# Altium PCB New_Action.PcbDoc
Units mm, origin at the board's own origin, x right, y up, seen from the top; angles counter-clockwise.
Board outline 110 x 60 mm, 2 copper layers (Top Layer, Bottom Layer); 59 components, 58 nets, 238 pads, 14 vias.
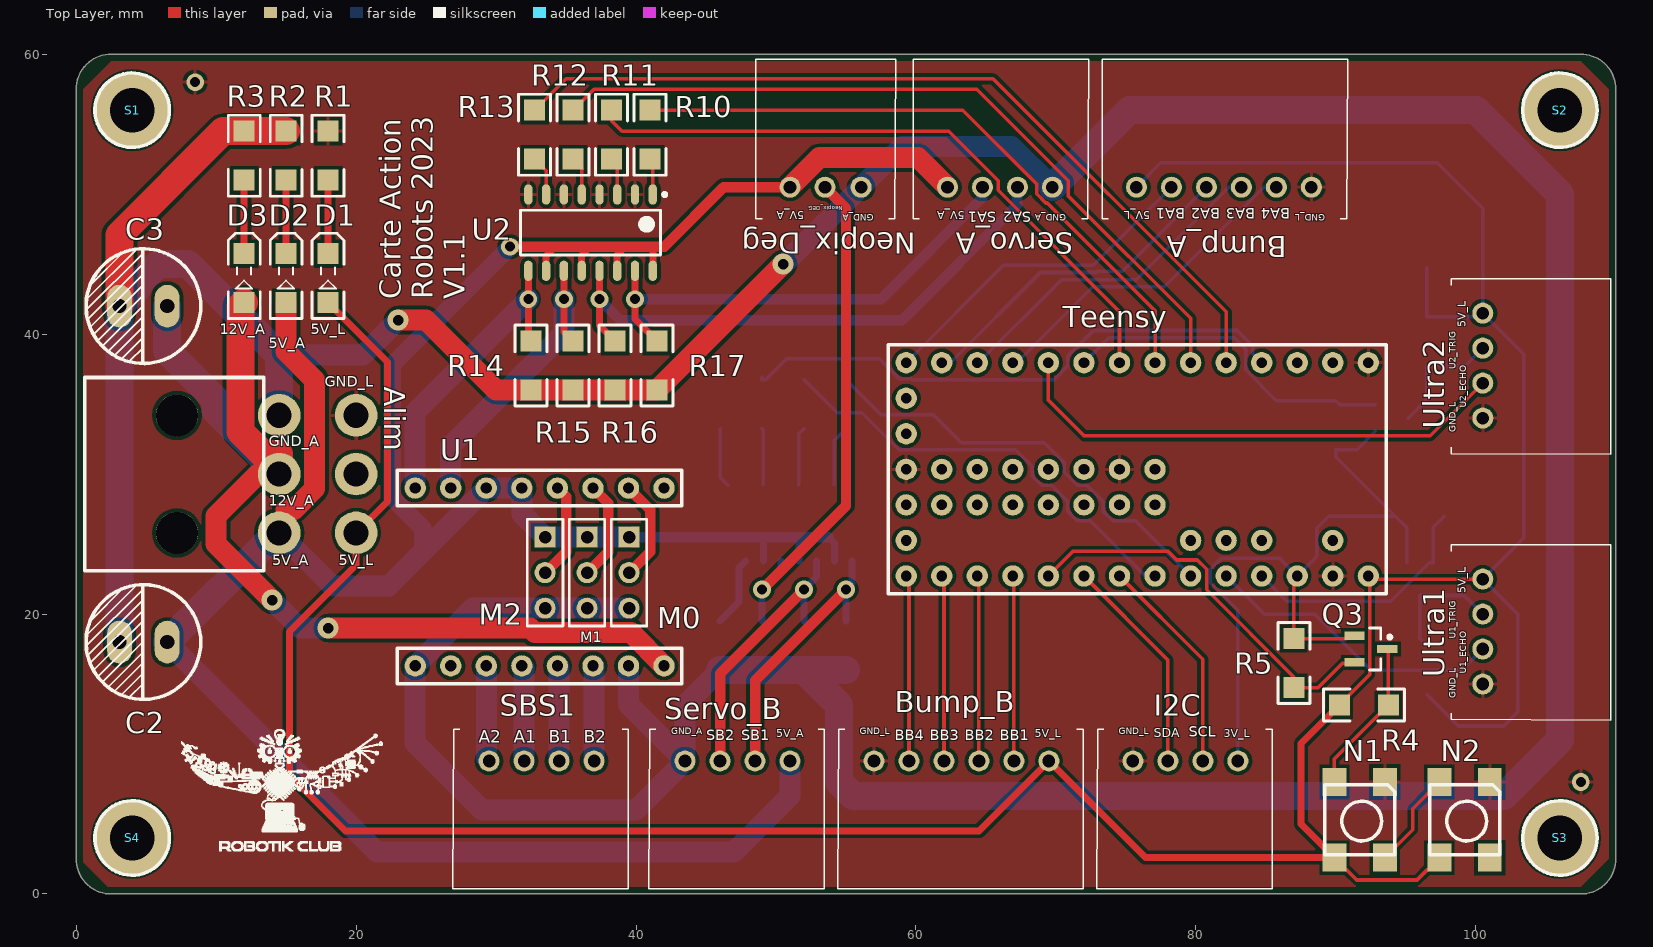
[diagram p0: Top Layer view]
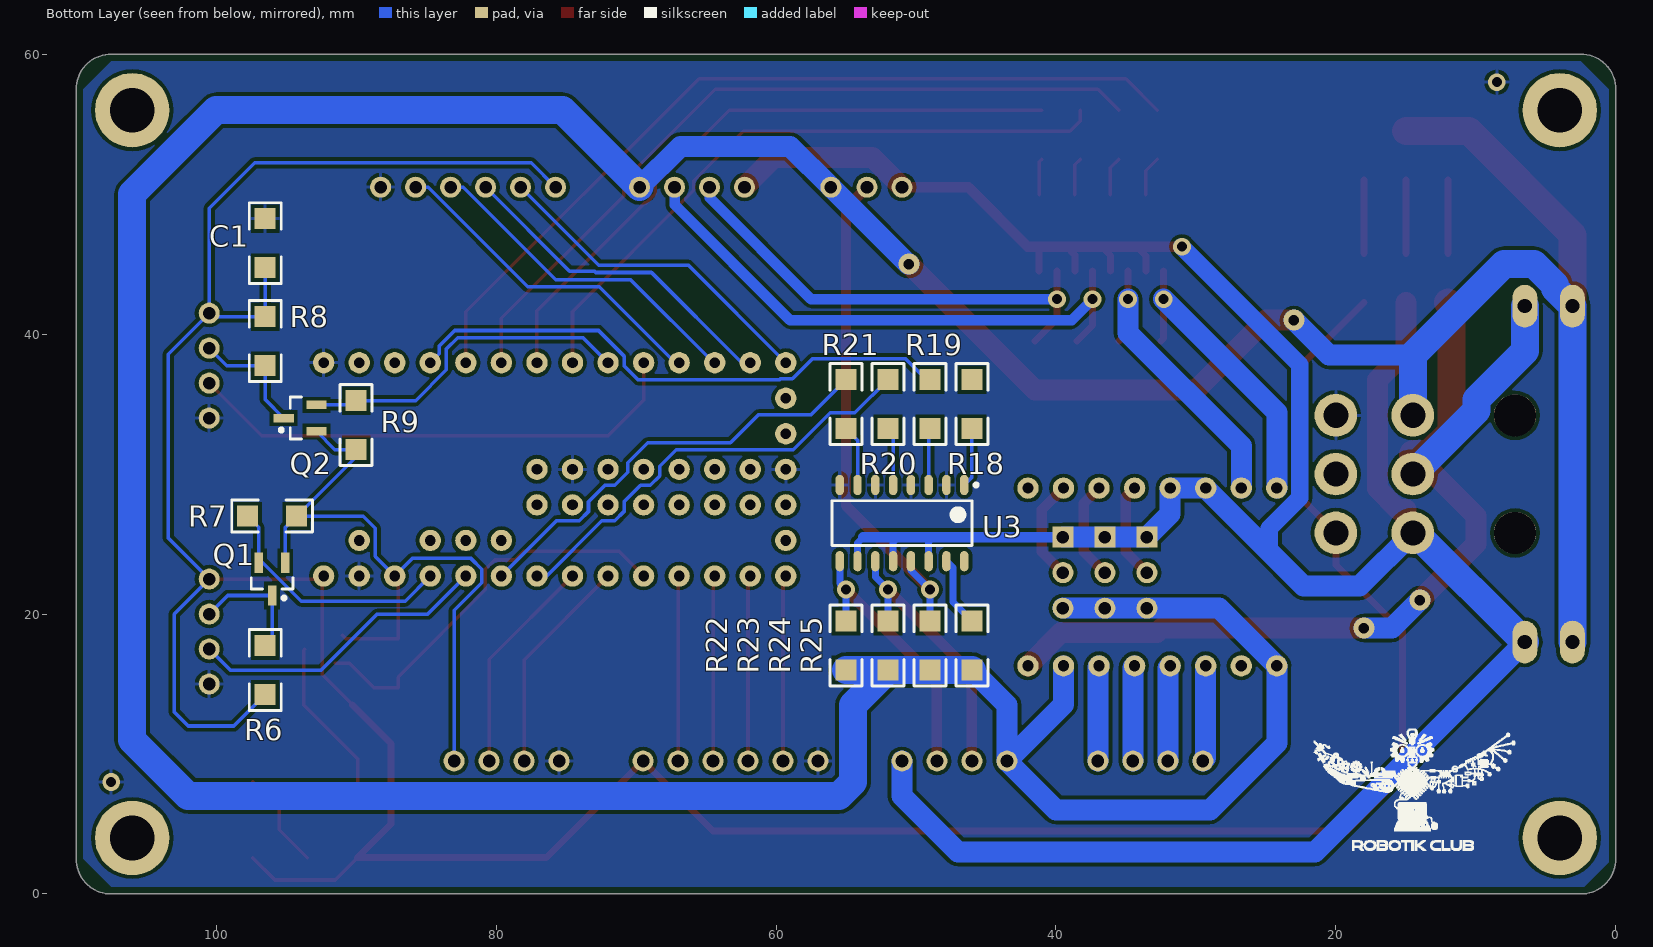
[diagram p1: Bottom Layer view, seen from below]

## Layer stack, top to bottom
Top Solder: solder mask 0.0102, Solder Resist, Dk 3.5
Top Layer: signal copper 0.0356
Dielectric 1: dielectric 0.32, FR-4, Dk 4.8
Bottom Layer: signal copper 0.0356
Bottom Solder: solder mask 0.0102, Solder Resist, Dk 3.5

## Board outline
2.5,60 107.5,60 cw(c107.5,57.5) 110,57.5 110,2.5 cw(c107.5,2.5) 107.5,0 2.5,0 cw(c2.5,2.5) 0,2.5 0,57.5 cw(c2.5,57.5)

## Design rules (kind name [scope] priority, off if disabled: settings)
Clearance [All] p1: gap=0.254
PolygonConnect [All] p1: connectstyle=Relief reliefconductorwidth=0.254 reliefentries=4 polygonreliefangle="90 Angle" airgapwidth=0.254
RoutingVias [All] p1: holewidth=0.711 width=1.27 viastyle="Through Hole" minholewidth=0.711 minwidth=1.27 maxholewidth=0.711 maxwidth=1.27
SolderMaskExpansion [All] p1: expansion=0.102
Width [All] p1: maxlimit=2 minlimit=0.254 preferedwidth=0.5
30 further rules are at their usual default settings.

## Classes and differential pairs
component class New_Action_Moteurs: M0 M1 M2 Neopix_Deg R10 R11 R12 R13 R14 R15 R16 R17 R18 R19 R20 R21 R22 R23 R24 R25 SBS1 Servo_A Servo_B U1 U2 U3
component class New_Action: Alim Bump_A Bump_B C1 C2 C3 D1 D2 D3 I2C N1 N2 Q1 Q2 Q3 R1 R2 R3 R4 R5 R6 R7 R8 R9 S1 S2 S3 S4 Teensy Ultra1 Ultra2

## Components (designator, comment, footprint, x,y, rotation, side; value= is the part's Value field where it differs from the comment)
Alim "Header 3X2H" MOLEX_MINIFITJR_3X2H 14.5,30 r270 top
Bump_A "Header 6H" S6B-XH-A 75.75,50.5 r0 top
Bump_B "Header 6H" S6B-XH-A 69.5,9.5 r180 top
C1 "(Optional)" "Capacitor 1206" 96.5,46.5 r270 bottom
C2 "Cap2" Condensateur 6.5,18 r180 top
C3 "Cap2" Condensateur 6.5,42 r180 top
D1 "5V_L" KP-3216SEC 18,44 r90 top
D2 "5V_A" KP-3216SEC 15,44 r90 top
D3 "12V_A" KP-3216SEC 12,44 r90 top
I2C "Header 4H" S4B-XH-A 83,9.5 r180 top
M0 "Header 3" HDR1X3 39.5,25.5 r270 top
M1 "Header 3" HDR1X3 36.5,25.5 r270 top
M2 "Header 3" HDR1X3 33.5,25.5 r270 top
N1 "WS2812C" WS2812C 93.5,8 r270 top
N2 "WS2812C" WS2812C 101,8 r270 top
Neopix_Deg "S3B-XH-A" S3B-XH-A 51,50.5 r0 top
Q1 "MOSFET-N" SOT23_M 96,22.5 r270 bottom
Q2 "MOSFET-N" SOT23_M 94,34 r0 bottom
Q3 "MOSFET-N" SOT23_M 92.5,17.5 r0 top
R1 "Res2" "Resistor 1206" 18,52.75 r270 top
R2 "Res2" "Resistor 1206" 15,52.75 r90 top
R3 "Res2" "Resistor 1206" 12,52.75 r90 top
R4 "Res2" "Resistor 1206" 92,13.5 r0 top
R5 "Res2" "Resistor 1206" 87,16.5 r270 top
R6 "Res2" "Resistor 1206" 96.5,16 r90 bottom
R7 "Res2" "Resistor 1206" 96,27 r0 bottom
R8 "Res2" "Resistor 1206" 96.5,39.5 r270 bottom
R9 "Res2" "Resistor 1206" 90,33.5 r90 bottom
R10 "Res2" "Resistor 1206" 41,54.25 r90 top
R11 "Res2" "Resistor 1206" 38.25,54.25 r90 top
R12 "Res2" "Resistor 1206" 35.5,54.25 r90 top
R13 "Res2" "Resistor 1206" 32.75,54.25 r90 top
R14 "Res2" "Resistor 1206" 32.5,37.75 r90 top
R15 "Res2" "Resistor 1206" 35.5,37.75 r90 top
R16 "Res2" "Resistor 1206" 38.5,37.75 r90 top
R17 "Res2" "Resistor 1206" 41.5,37.75 r90 top
R18 "Res2" "Resistor 1206" 46,35 r90 bottom
R19 "Res2" "Resistor 1206" 49,35 r90 bottom
R20 "Res2" "Resistor 1206" 52,35 r90 bottom
R21 "Res2" "Resistor 1206" 55,35 r90 bottom
R22 "Res2" "Resistor 1206" 55,17.75 r90 bottom
R23 "Res2" "Resistor 1206" 52,17.75 r90 bottom
R24 "Res2" "Resistor 1206" 49,17.75 r90 bottom
R25 "Res2" "Resistor 1206" 46,17.75 r90 bottom
S1 "Screw M3" "Screw M3" 4,56 r0 top
S2 "Screw M3" "Screw M3" 106,56 r0 top
S3 "Screw M3" "Screw M3" 106,4 r0 top
S4 "Screw M3" "Screw M3" 4,4 r0 top
SBS1 "Header 4" S4B-XH-A 37,9.5 r180 top
Servo_A "Header 4H" S4B-XH-A 62.25,50.5 r0 top
Servo_B "Header 4H" S4B-XH-A 51,9.5 r180 top
Teensy "Teensy 3.2" teensy 72,40.5 r270 top
U1 "DRV8825" DRV8825 42,29 r270 top
U2 "PhotoCoupler" "16 pins SOIC, TI" 36.75,47.25 r270 top
U3 "PhotoCoupler" "16 pins SOIC, TI" 51,26.5 r270 bottom
Ultra1 "Header 4H" S4B-XH-A 100.5,22.5 r270 top
Ultra2 "Header 4H" S4B-XH-A 100.5,41.5 r270 top
? "" Logo_lowres 14.5,8 r0 top
? "" Logo_lowres 14.576,8.025 r180 top

## Footprints (in the part's own frame and the unit in brackets; to place one, negate y for a bottom-side part, rotate by r counter-clockwise, add the part's x,y. Pads: shape width x height; smd on the part's side, far side on the other; paste and mask are expansions set on the pad)
"16 pins SOIC, TI" [mm] "SOIC, 16-Leads, Body 9,90x3,90mm, Pitch 1,27mm, IPC Medium Density"
  oval 1.45x0.6 smd: 1(-2.725,4.445) 2(-2.725,3.175) 3(-2.725,1.905) 4(-2.725,0.635) 5(-2.725,-0.635) 6(-2.725,-1.905) 7(-2.725,-3.175) 8(-2.725,-4.445) 9(2.725,-4.445) 10(2.725,-3.175) 11(2.725,-1.905) 12(2.725,-0.635) 13(2.725,0.635) 14(2.725,1.905) 15(2.725,3.175) 16(2.725,4.445)
  silkscreen extent -2.85,-5 1.6,5.42, body extent -3,-5 3,5, height 1.75
"Capacitor 1206" [mm]
  rect 1.5x1.5 smd: 1(-1.75,0) 2(1.75,0)
  silkscreen extent -2.89,-1.14 2.89,1.14, body extent -1.98,-0.99 1.98,0.96, height 1.3
Condensateur [mil]
  oval 70x120 hole 40: 1(0,0) 2(133.86,0)
  silkscreen extent -94,-161 228,161, body extent -93,-160 227,160, height 500
DRV8825 [mil] "Stepper Driver"
  round 60 hole 31.5: 1(0,0) 2(0,-100) 3(0,-200) 4(0,-300) 5(0,-400) 6(0,-500) 7(0,-600) 8(0,-700) 9(500,-700) 10(500,-600) 11(500,-500) 12(500,-400) 13(500,-300) 14(500,-200) 15(500,-100) 16(500,0)
  silkscreen extent -50,-750 550,50, body extent -50,-764 550,63, height 446
HDR1X3 [mm] "Connector; Header; 3 Position"
  rect 1.5x1.5 hole 0.9: 1(0,0)
  round 1.5 hole 0.9: 2(2.54,0) 3(5.08,0)
  silkscreen extent -1.27,-1.27 6.35,1.27
KP-3216SEC [mm]
  rect 1.5x1.5 smd: 1(-1.75,0) 2(1.75,0)
  silkscreen extent -2.89,-1.14 3.2,1.14, body extent -1.7,-0.79 1.5,0.81, height 1.1
Logo_lowres [mm]
  silkscreen extent -7.01,-4.93 7.39,3.76
MOLEX_MINIFITJR_3X2H [mm] "MOLEX_MINIFITJR_3X2H, 39-30-1060"
  round 3.048 hole 1.8: 1(-4.2,5.5) 2(-4.2,0) 3(0,5.5) 4(0,0) 5(4.2,5.5) 6(4.2,0)
  round 3 hole 3 unplated: 10(-4.2,-7.3) 11(4.2,-7.3)
  silkscreen extent -6.9,-13.9 6.9,-1.1, body extent -6.9,-13.9 7.3,6.04, height 11.41
"Resistor 1206" [mm]
  rect 1.5x1.5 smd: 1(-1.75,0) 2(1.75,0)
  silkscreen extent -2.89,-1.14 2.89,1.14, body extent -1.98,-0.95 1.98,0.93, height 0.55
S3B-XH-A [mm]
  round 1.5 hole 0.9: 1(0,0) 2(2.5,0) 3(5.08,0)
  silkscreen extent -2.45,-2.26 7.54,9.14, body extent -2.44,-2.27 7.46,9.23, height 6.15
S4B-XH-A [mm]
  round 1.5 hole 0.9: 1(0,0) 2(2.5,0) 3(5,0) 4(7.5,0)
  silkscreen extent -2.45,-2.26 10.08,9.14, body extent -2.44,-2.32 9.96,9.18, height 6.15
S6B-XH-A [mm]
  round 1.5 hole 0.9: 1(0,0) 2(2.5,0) 3(5,0) 4(7.5,0) 5(10,0) 6(12.5,0)
  silkscreen extent -2.45,-2.26 15.08,9.14, body extent -2.45,-2.3 14.95,9.2, height 6.15
"Screw M3" [mm] "M3 iso Screw"
  round 5.32 hole 3.2 unplated: 0(0,0)
  silkscreen extent -2.66,-2.66 2.66,2.66
SOT23_M [mm] "SOT23, 3-Leads, Body 2.9x1.3mm, Pitch 0.95mm, Lead Span 2.3mm - Reverse Pinning, IPC Low Density"
  rect 1.45x0.6 smd: 1(1.175,0) 2(-1.175,-0.95) 3(-1.175,0.95)
  silkscreen extent -0.1,-1.5 1.47,1.5, body extent -0.7,-1.5 0.7,1.5, height 1.1
teensy [mil] "Teensy 3.2"
  round 60 hole 30: 0(100,700) 1(100,600) 2(100,500) 3(100,400) 4(100,300) 5(100,200) 6(100,100) 7(100,0) 8(100,-100) 9(100,-200) 10(100,-300) 11(100,-400) 12(100,-500) 13(700,-500) 14(700,-400) 15(700,-300) 16(700,-200) 17(700,-100) 18(700,0) 19(700,100) 20(700,200) 21(700,300) 22(700,400) 23(700,500) 24(400,0) 25(400,-100) 26(400,-200) 27(400,-300) 28(400,-400) 29(500,-400) 30(500,-300) 31(500,-200) 32(500,-100) 33(500,0) 34(600,400) 35(600,300) 36(400,200) 37(500,200) 38(600,500) 39(500,100) 40(400,100) 41(700,600) 42(700,700) 43(700,800) 44(100,800) 45(600,-500) 46(500,-500) 47(400,-500) 48(300,-500) 49(200,-500) 50(600,700)
  silkscreen extent 50,-550 750,850, body extent 49,-561 753,904, height 468
WS2812C [mm]
  rect 2x1.7 smd: 1(5.4,-3.6) 2(5.4,0) 3(0,0) 4(0,-3.6)
  silkscreen extent 0.2,-4.3 5.2,0.7, body extent 0.19,-4.33 5.19,0.67, height 2

## Part data
Alim: "Header, 3-Pin, Dual row, Right Angle"
Bump_A Bump_B: "Header, 6-Pin, Right Angle"
C1: library part Cap, "Capacitor"
C2 C3: "Capacitor"
D1 D2 D3: library part LED2, "Typical RED, GREEN, YELLOW, AMBER GaAs LED"
I2C Servo_A Servo_B Ultra1 Ultra2: "Header, 4-Pin, Right Angle"
M0 M1 M2: "Header, 3-Pin"
N1 N2: "Intelligent control LED"
Neopix_Deg: library part "Header 3H", "Header, 3-Pin, Right Angle"
Q1 Q2 Q3: "N-Channel MOSFET"
R1 R2 R3 R4 R5 R6 R7 R8 R9 R10 R11 R12 R13 R14 R15 R16 R17 R18 R19 R20 R21 R22 R23 R24 R25: "Resistor"
SBS1: "Header, 4-Pin"
Teensy: library part teensy3.2
U1: "Stepper Driver Module"
U2 U3: library part LTV-247, "Integrated Circuit"

## Via types
v1: diameter 1.27, hole 0.711, Top Layer to Bottom Layer, 10 vias
v2: diameter 1.5, hole 0.75, Top Layer to Bottom Layer, 4 vias

## Nets (pads, with @x,y where several pads share a name; then routed paths per layer and width w, separated by ;. In a path a pad name is that pad's centre, name@x,y a point inside that pad or via, vN(x,y) a via of type N, cw(c..) or ccw(c..) an arc to the next point about the centre after c; other vN are vias at no path point)
3V_L: I2C.1 Q1.3 Q2.3 Q3.3 R5.1 R7.1 R9.1 Teensy.41 | length 53.8
  Top Layer w0.254: Teensy.41 87,22.48 R5.1 90.75,18.25 Q3.3@91,18.5
  Bottom Layer w0.254: I2C.1 83,20.264 81.017,22.247 81.017,23.193 81.824,24 85.96,24 Teensy.41 88.637,24.117 88.637,26.137 89.5,27 R7.1 ; Q2.3 91.525,31.75 R9.1 90,31.25 R7.1 ; Q1.3 95.05,26.2 R7.1
5V_A: Alim.6 C2.1 D2.1 M0.1 M1.1 M2.1 Neopix_Deg.1 Servo_A.1 Servo_B.1 U1.5 U1.6 U2.10 U2.12 U2.14 U2.16 U3.10 U3.12 U3.14 | length 205.4
  Top Layer w0.5: U2.10 33.575,45.575 34.25,46.25 ; U2.12 36.115,45.615 36.75,46.25 ; U2.14 38.655,45.655 39.25,46.25 ; U2.16 41.195,45.945 41.5,46.25
  Top Layer w0.75: v1(31,46.25) 34.25,46.25 36.75,46.25 39.25,46.25 41.5,46.25 42,46.25 46.25,50.5 Neopix_Deg.1
  Top Layer w1.5: Alim.6 15,26.3 15,27.472 15.547,27.472 17.028,28.953 17.028,36.728 15,38.756 D2.1 ; Neopix_Deg.1 53.103,52.603 60.147,52.603 Servo_A.1
  Bottom Layer w0.5: 48.75,25.5 49.095,25.155 U3.14 ; 51.25,25.5 51.635,25.115 U3.12 ; 53.75,25.5 54.175,25.075 U3.10
  Bottom Layer w0.75: M0.1 48.75,25.5 51.25,25.5 53.75,25.5
  Bottom Layer w1.25: 25.237,24.937 24.763,24.937 24.763,26.137 22.579,28.32 22.579,37.829 v1(31,46.25)
  Bottom Layer w1.5: C2.1 21.5,3 47,3 51,7 Servo_B.1 ; Alim.6 18.3,22 22.3,22 25.237,24.937 U1.6 U1.5 31.84,27.16 M2.1 M1.1 M0.1
  Bottom Layer w2: C2.1 14.3,25.8 Alim.6
5V_L: Alim.5 Bump_A.1 Bump_B.1 C1.2 D1.1 N1.1 N2.1 R4.1 R6.1 R8.1 Teensy.43 Ultra1.1 Ultra2.1 | length 241.2
  Top Layer w0.254: N1.1 91.5,1 95.8,1 N2.1 ; R4.1 92.431,15.681 Teensy.43@92.431,22.609 ; Teensy.43 Teensy.43@92.431,22.609 ; Ultra1.1 92.54,22.5 Teensy.43@92.431,22.609
  Top Layer w0.5: D1.1 22.25,38 22.25,28.05 Alim.5 20,23.5 15.25,18.75 15.25,8.5 19.25,4.5 64.5,4.5 Bump_B.1 76.4,2.6 N1.1 87.5,5 87.5,10.75 R4.1
  Bottom Layer w0.254: Bump_A.1 77.5,52.25 97.25,52.25 100.5,49 Ultra2.1 103.429,38.571 103.429,25.429 Ultra1.1 103,20 103,13 102,12 98.75,12 R6.1 ; C1.2 R8.1 Ultra2.1@100.25,41.25
12V_A: Alim.4 C3.1 D3.1 U1.16 | length 72.8
  Top Layer w1.5: v2(14,21) 10,25 10,27 13,30 Alim.4 ; v2(18,19) 32.439,19 32.773,18.666 39.634,18.666 U1.16
  Top Layer w2: D3.1 11.722,41.972 11.722,33.049 13.349,31.422 14.5,31.422 Alim.4
  Bottom Layer w1.5: v2(14,21) 16,19 v2(18,19)
  Bottom Layer w2: C3.1 6.5,38.795 9.954,35.341 9.954,34.546 Alim.4
GND_A: Alim.2 C2.2 C3.2 M0.3 M1.3 M2.3 Neopix_Deg.3 R2.2 R3.2 R14.1 R15.1 R16.1 R17.1 R22.1 R23.1 R24.1 R25.1 Servo_A.4 Servo_B.4 U1.9 U1.15 | length 343.5
  Top Layer w1.5: v2(23,41) 25,41 30,36 R17.1 v2(50.5,45)
  Top Layer w2: C3.2 3.1,47.1 10.5,54.5 R2.2
  Bottom Layer w1.5: 14.5,38.5 20.5,38.5 v2(23,41) ; U1.15 39.46,13.54 Servo_B.4 ; M0.3 M1.3 M2.3 28.34,20.42 U1.9 24.22,10.78 29,6 40,6 Servo_B.4 ; R25.1 43.5,13.5 Servo_B.4 ; v2(50.5,45) 50.58,45 Neopix_Deg.3 59,53.42 66.83,53.42 Servo_A.4
  Bottom Layer w2: C2.2 C3.2 4.357,43.257 4.357,43.523 5.834,45 8,45 14.5,38.5 Alim.2 ; R25.1 R24.1 R23.1 ; R22.1 R23.1 ; Servo_A.4 75.25,56 100,56 106,50 106,11 102,7 55.5,7 54.5,8 54.5,13.5 R23.1
GND_L: Alim.1 Bump_A.6 Bump_B.6 C1.1 I2C.4 N1.3 N2.3 R1.1 Teensy.40 Teensy.42 Teensy.44 Teensy.47 U2.2 U2.4 U2.6 U2.8 U3.2 U3.4 U3.6 U3.8 Ultra1.4 Ultra2.4
  other v1: 107.5,8 8.5,58
I2C_SCL: I2C.2 Teensy.19 | length 15.7
  Top Layer w0.254: Teensy.19 80.5,16.76 I2C.2
I2C_SDA: I2C.3 Teensy.18 | length 15.7
  Top Layer w0.254: Teensy.18 78,16.72 I2C.3
NEOPIXEL: N1.4 Q3.1 R4.2 | length 11.1
  Top Layer w0.254: N1.4 89.9,9.65 R4.2 93.75,17.425 Q3.1
NetD1_2: D1.2 R1.2 | length 5.3
  Top Layer w0.5: D1.2 R1.2
NetD2_2: D2.2 R2.1 | length 5.3
  Top Layer w0.5: D2.2 R2.1
NetD3_2: D3.2 R3.1 | length 5.3
  Top Layer w0.5: D3.2 R3.1
NetN1_2: N1.2 N2.4 | length 7
  Top Layer w0.254: N1.2 95.5,4.6 95.5,6.1 N2.4
NetR10_1: R10.1 U2.1 | length 2.6
  Top Layer w0.254: R10.1 41.195,52.305 U2.1
NetR11_1: R11.1 U2.3 | length 2.7
  Top Layer w0.254: R11.1 38.655,52.095 U2.3
NetR12_1: R12.1 U2.5 | length 2.8
  Top Layer w0.254: R12.1 36.115,51.885 U2.5
NetR13_1: R13.1 U2.7 | length 2.9
  Top Layer w0.254: R13.1 33.575,51.675 U2.7
NetR18_1: R18.1 U3.1 | length 4.3
  Bottom Layer w0.254: R18.1 46,29.78 U3.1
NetR19_1: R19.1 U3.3 | length 4.1
  Bottom Layer w0.254: R19.1 49.095,33.155 U3.3
NetR20_1: R20.1 U3.5 | length 4.2
  Bottom Layer w0.254: U3.5 51.635,32.885 R20.1
NetR21_1: R21.1 U3.7 | length 4.4
  Bottom Layer w0.254: U3.7 54.175,32.425 R21.1
NetR25_2: R25.2 U3.15 | length 5
  Bottom Layer w0.5: R25.2 47.359,20.859 47.359,23.309 U3.15
NetSBS1_1: SBS1.1 U1.14 | length 6.8
  Bottom Layer w1.5: U1.14 37,16.22 SBS1.1
NetSBS1_2: SBS1.2 U1.13 | length 6.8
  Bottom Layer w1.5: U1.13 34.5,16.18 SBS1.2
NetSBS1_3: SBS1.3 U1.12 | length 6.9
  Bottom Layer w1.5: U1.12 32,16.14 SBS1.3
NetSBS1_4: SBS1.4 U1.11 | length 6.9
  Bottom Layer w1.5: U1.11 29.3,9.7 SBS1.4
O_NEOPIX_DEG: Neopix_Deg.2 R24.2 U3.13 | length 36.7
  Top Layer w0.75: v1(49,21.75) 55,27.75 55,49 Neopix_Deg.2
  Bottom Layer w0.5: R24.2 v1(49,21.75) 50.365,23.115 U3.13
O_SBS_DIR: R15.2 U1.7 U2.11 | length 22.1
  Top Layer w0.5: U2.11 v1(34.845,42.5) 34.845,40.155 R15.2
  Bottom Layer w1.5: U1.7 26.76,32.01 34.845,40.095 v1(34.845,42.5)
O_SBS_STEP: R14.2 U1.8 U2.9 | length 22
  Top Layer w0.5: U2.9 32.305,39.695 R14.2
  Bottom Layer w1.5: U1.8 24.22,34.415 v1(32.305,42.5)
O_SERVO_A1: R17.2 Servo_A.2 U2.15 | length 34.3
  Top Layer w0.5: U2.15 39.925,41.075 R17.2
  Bottom Layer w0.75: v1(39.925,42.5) 57.5,42.5 64.75,49.75 Servo_A.2
O_SERVO_A2: R16.2 Servo_A.3 U2.13 | length 40.6
  Top Layer w0.5: U2.13 37.385,40.615 R16.2
  Bottom Layer w0.75: v1(37.385,42.5) 38.885,41 59,41 67.25,49.25 Servo_A.3
O_SERVO_B1: R22.2 Servo_B.2 U3.9 | length 19.4
  Top Layer w0.75: Servo_B.2 48.5,15.25 v1(55,21.75)
  Bottom Layer w0.5: R22.2 v1(55,21.75) 55.445,22.195 U3.9
O_SERVO_B2: R23.2 Servo_B.3 U3.11 | length 19.4
  Top Layer w0.75: Servo_B.3 46,15.75 v1(52,21.75)
  Bottom Layer w0.5: R23.2 v1(52,21.75) 52.905,22.655 U3.11
SBS_M0: M0.2 U1.2 | length 7.3
  Top Layer w0.75: U1.2 41,27.46 41,24.46 M0.2
SBS_M1: M1.2 U1.3 | length 7.1
  Top Layer w0.75: M1.2 38,24.46 38,27.92 U1.3
SBS_M2: M2.2 U1.4 | length 6.9
  Top Layer w0.75: M2.2 35,24.46 35,28.38 U1.4
T_BUMP_A1: Bump_A.2 Teensy.12 | length 24.1
  Bottom Layer w0.254: Teensy.12 66.25,44.91 72.66,44.91 Bump_A.2
T_BUMP_A2: Bump_A.3 Teensy.11 | length 24.1
  Bottom Layer w0.254: Teensy.11 62.46,37.96 68.902,44.402 72.87,44.402 72.968,44.5 74.75,44.5 Bump_A.3
T_BUMP_A3: Bump_A.4 Teensy.10 | length 24.1
  Bottom Layer w0.254: Teensy.10 64.46,37.96 70.394,43.894 75.743,43.894 82.349,50.5 Bump_A.4
T_BUMP_A4: Bump_A.5 Teensy.9 | length 24
  Bottom Layer w0.254: Teensy.9 67.21,37.96 72.636,43.386 77.735,43.386 84.849,50.5 Bump_A.5
T_BUMP_B1: Bump_B.2 Teensy.16 | length 13.3
  Top Layer w0.254: Teensy.16 67,22.64 Bump_B.2
T_BUMP_B2: Bump_B.3 Teensy.15 | length 13.3
  Top Layer w0.254: Teensy.15 64.5,22.6 Bump_B.3
T_BUMP_B3: Bump_B.4 Teensy.14 | length 13.3
  Top Layer w0.254: Teensy.14 62,22.56 Bump_B.4
T_BUMP_B4: Bump_B.5 Teensy.13 | length 13.3
  Top Layer w0.254: Teensy.13 59.5,22.52 Bump_B.5
T_NEOPIX_DEG: R19.2 Teensy.2 | length 40.3
  Bottom Layer w0.254: R19.2@49,36.925 R19.2 49.25,36.75 50.75,38.25 57.394,38.25 58.827,36.817 59.683,36.817 59.75,36.75 69.866,36.75 70.857,37.741 70.857,38.433 72.682,40.258 82.96,40.258 84.065,39.153 84.065,38.595 Teensy.2
T_NEOPIXEL: Q3.2 R5.2 Teensy.17 | length 28.8
  Top Layer w0.254: Teensy.17 71.24,24.5 78,24.5 78.637,23.863 80.093,23.863 80.763,23.193 80.763,21.737 87,15.5 R5.2 88.75,14.75 90.5,16.5 Q3.2@91.5,16.5
T_SBS_DIR: R12.2 Teensy.4 | length 55.3
  Top Layer w0.254: R12.2 37,57.5 64.349,57.5 70.881,50.968 70.881,49.869 79.62,41.13 Teensy.4
T_SBS_STEP: R13.2 Teensy.3 | length 60.9
  Top Layer w0.254: R13.2 35,58.25 65.5,58.25 82.16,41.59 Teensy.3
T_SERVO_A1: R10.2 Teensy.5 | length 46.1
  Top Layer w0.254: R10.2 63.349,56 68.619,50.73 68.619,50.032 69.282,49.369 69.381,49.369 77.08,41.67 Teensy.5
T_SERVO_A2: R11.2 Teensy.6 | length 46.7
  Top Layer w0.254: R11.2 38.25,55.25 39,54.5 62.349,54.5 65.881,50.968 65.881,50.27 74.54,41.611 Teensy.6
T_SERVO_B1: R21.2 Teensy.21 | length 31.2
  Bottom Layer w0.254: R21.2 57.5,34.25 61.25,34.25 63.255,32.245 69.171,32.245 70.603,30.813 70.603,30.121 71.527,29.197 72.219,29.197 73.397,28.019 73.397,27.327 74.067,26.657 75.683,26.657 Teensy.21
T_SERVO_B2: R20.2 Teensy.20 | length 31.7
  Bottom Layer w0.254: R20.2 54.369,34.381 56.131,34.381 58.775,31.737 67.139,31.737 68.317,30.559 68.317,29.867 68.987,29.197 69.679,29.197 70.857,28.019 70.857,27.327 71.527,26.657 72.443,26.657 76.38,22.72 Teensy.20
T_ULTRA1_ECHO: Teensy.22 Ultra1.3 | length 21.7
  Bottom Layer w0.254: Teensy.22 84.88,20 88.5,20 92.5,16 99,16 Ultra1.3
T_ULTRA1_TRIG: Q1.2 R7.2 Teensy.23 | length 17.8
  Bottom Layer w0.254: Teensy.23 86.5,20.92 93.92,20.92 96.675,23.675 Q1.2 96.95,26.2 R7.2
T_ULTRA2_ECHO: Teensy.8 Ultra2.3 | length 36.3
  Top Layer w0.254: Teensy.8 69.46,35.29 72,32.75 96.75,32.75 Ultra2.3
T_ULTRA2_TRIG: Q2.2 R9.2 Teensy.7 | length 24.4
  Bottom Layer w0.254: Teensy.7 73.79,39.75 82.75,39.75 83.557,38.943 83.557,37.443 85.75,35.25 R9.2 90.3,34.95 Q2.2
ULTRA1_TRIG: Q1.1 R6.2 Ultra1.2 | length 8.8
  Bottom Layer w0.254: R6.2 96,18.25 Q1.1 99.175,21.325 Ultra1.2
ULTRA2_TRIG: Q2.1 R8.2 Ultra2.2 | length 8.8
  Bottom Layer w0.254: Q2.1 96.5,35.325 R8.2 99.25,37.75 Ultra2.2
pads on no net: Alim.3 Alim.10 Alim.11 N2.2 R18.2 S1.0 S2.0 S3.0 S4.0 Teensy.0 Teensy.1 Teensy.24 Teensy.25 Teensy.26 Teensy.27 Teensy.28 Teensy.29 Teensy.30 Teensy.31 Teensy.32 Teensy.33 Teensy.34 Teensy.35 Teensy.36 Teensy.37 Teensy.38 Teensy.39 Teensy.45 Teensy.46 Teensy.48 Teensy.49 Teensy.50 U1.1 U1.10 U3.16

## Polygon pours and split planes (outlines as drawn)
GND_L on Top Layer "GND_plane" (solid, remove dead copper, pour order 0): 2.5,59.5 107.5,59.5 109.5,57.5 109.5,2.5 107.5,0.5 2.5,0.5 2.25,0.5 0.5,2.25 0.5,57.5 2.5,59.5
GND_L on Bottom Layer "GND_plane" (solid, remove dead copper, pour order 2): 0.5,57.5 2.5,59.5 107.5,59.5 109.5,57.5 109.5,2.5 107.5,0.5 2.25,0.5 0.5,2.25 0.5,57.5

## Silkscreen, mask and mechanical layers (free items; w line width, h text height)
Top Overlay:
  text "Neopix_DEG" at 54.75,49.25 h0.5 r180
  text "BA1" at 79.25,49.25 h1.3 r180
  text "BA2" at 81.75,49.25 h1.3 r180
  text "BA3" at 84.25,49.25 h1.3 r180
  text "BA4" at 86.75,49.25 h1.3 r180
  text "5V_A" at 52,49 h1 r180
  text "5V_A" at 63.5,49 h1 r180
  text "SA1" at 65.75,49 h1.3 r180
  text "SA2" at 68.25,49 h1.3 r180
  text "5V_L" at 76.75,49 h1 r180
  text "GND_A" at 57,48.75 h0.8 r180
  text "GND_A" at 70.75,48.75 h0.8 r180
  text "GND_L" at 89.25,48.75 h0.8 r180
  text "Carte Action / Robots 2023 / V1.1" at 27.75,42.5 h1.52 r90
  text "5V_L" at 99.5,40.5 h1 r90
  text "12V_A" at 10.25,39.75 h1.3
  text "5V_L" at 16.75,39.75 h1.3
  text "5V_A" at 13.75,38.75 h1.3
  text "U2_TRIG" at 98.75,37.5 h0.8 r90
  text "GND_L" at 17.75,36 h1.3
  text "U2_ECHO" at 99.5,34.75 h0.8 r90
  text "GND_L" at 98.75,33 h0.8 r90
  text "GND_A" at 13.75,31.75 h1.3
  text "12V_A" at 13.75,27.5 h1.3
  text "5V_A" at 14,23.25 h1.3
  text "5V_L" at 18.75,23.25 h1.3
  text "5V_L" at 99.5,21.5 h1 r90
  text "U1_TRIG" at 98.75,18.25 h0.8 r90
  text "U1_ECHO" at 99.5,15.75 h0.8 r90
  text "GND_L" at 98.75,14 h0.8 r90
  text "GND_A" at 42.5,11.25 h0.8
  text "GND_L" at 56,11.25 h0.8
  text "GND_L" at 74.5,11.25 h0.8
  text "5V_A" at 50,11 h1
  text "5V_L" at 68.5,11 h1
  text "SDA" at 77,11 h1.1
  text "SCL" at 79.5,11 h1.3
  text "3V_L" at 82,11 h1
  text "SB2" at 45,10.75 h1.3
  text "SB1" at 47.5,10.75 h1.3
  text "BB4" at 58.5,10.75 h1.3
  text "BB3" at 61,10.75 h1.3
  text "BB2" at 63.5,10.75 h1.3
  text "BB1" at 66,10.75 h1.3
  text "A2" at 28.75,10.5 h1.52
  text "A1" at 31.25,10.5 h1.52
  text "B1" at 33.75,10.5 h1.52
  text "B2" at 36.25,10.5 h1.52
Mechanical 1:
  the board outline again, w0.254